# Altium PCB TL-WR703N.PcbDoc (part 1 of 3)
Units mm, origin at the board's own origin, x right, y up, seen from the top; angles counter-clockwise.
Board outline 48.52 x 50.08 mm, 2 copper layers (Top, Bottom); 241 components, 226 nets, 742 pads, 501 vias.
Unrouted connection lines stored in the file: 88.
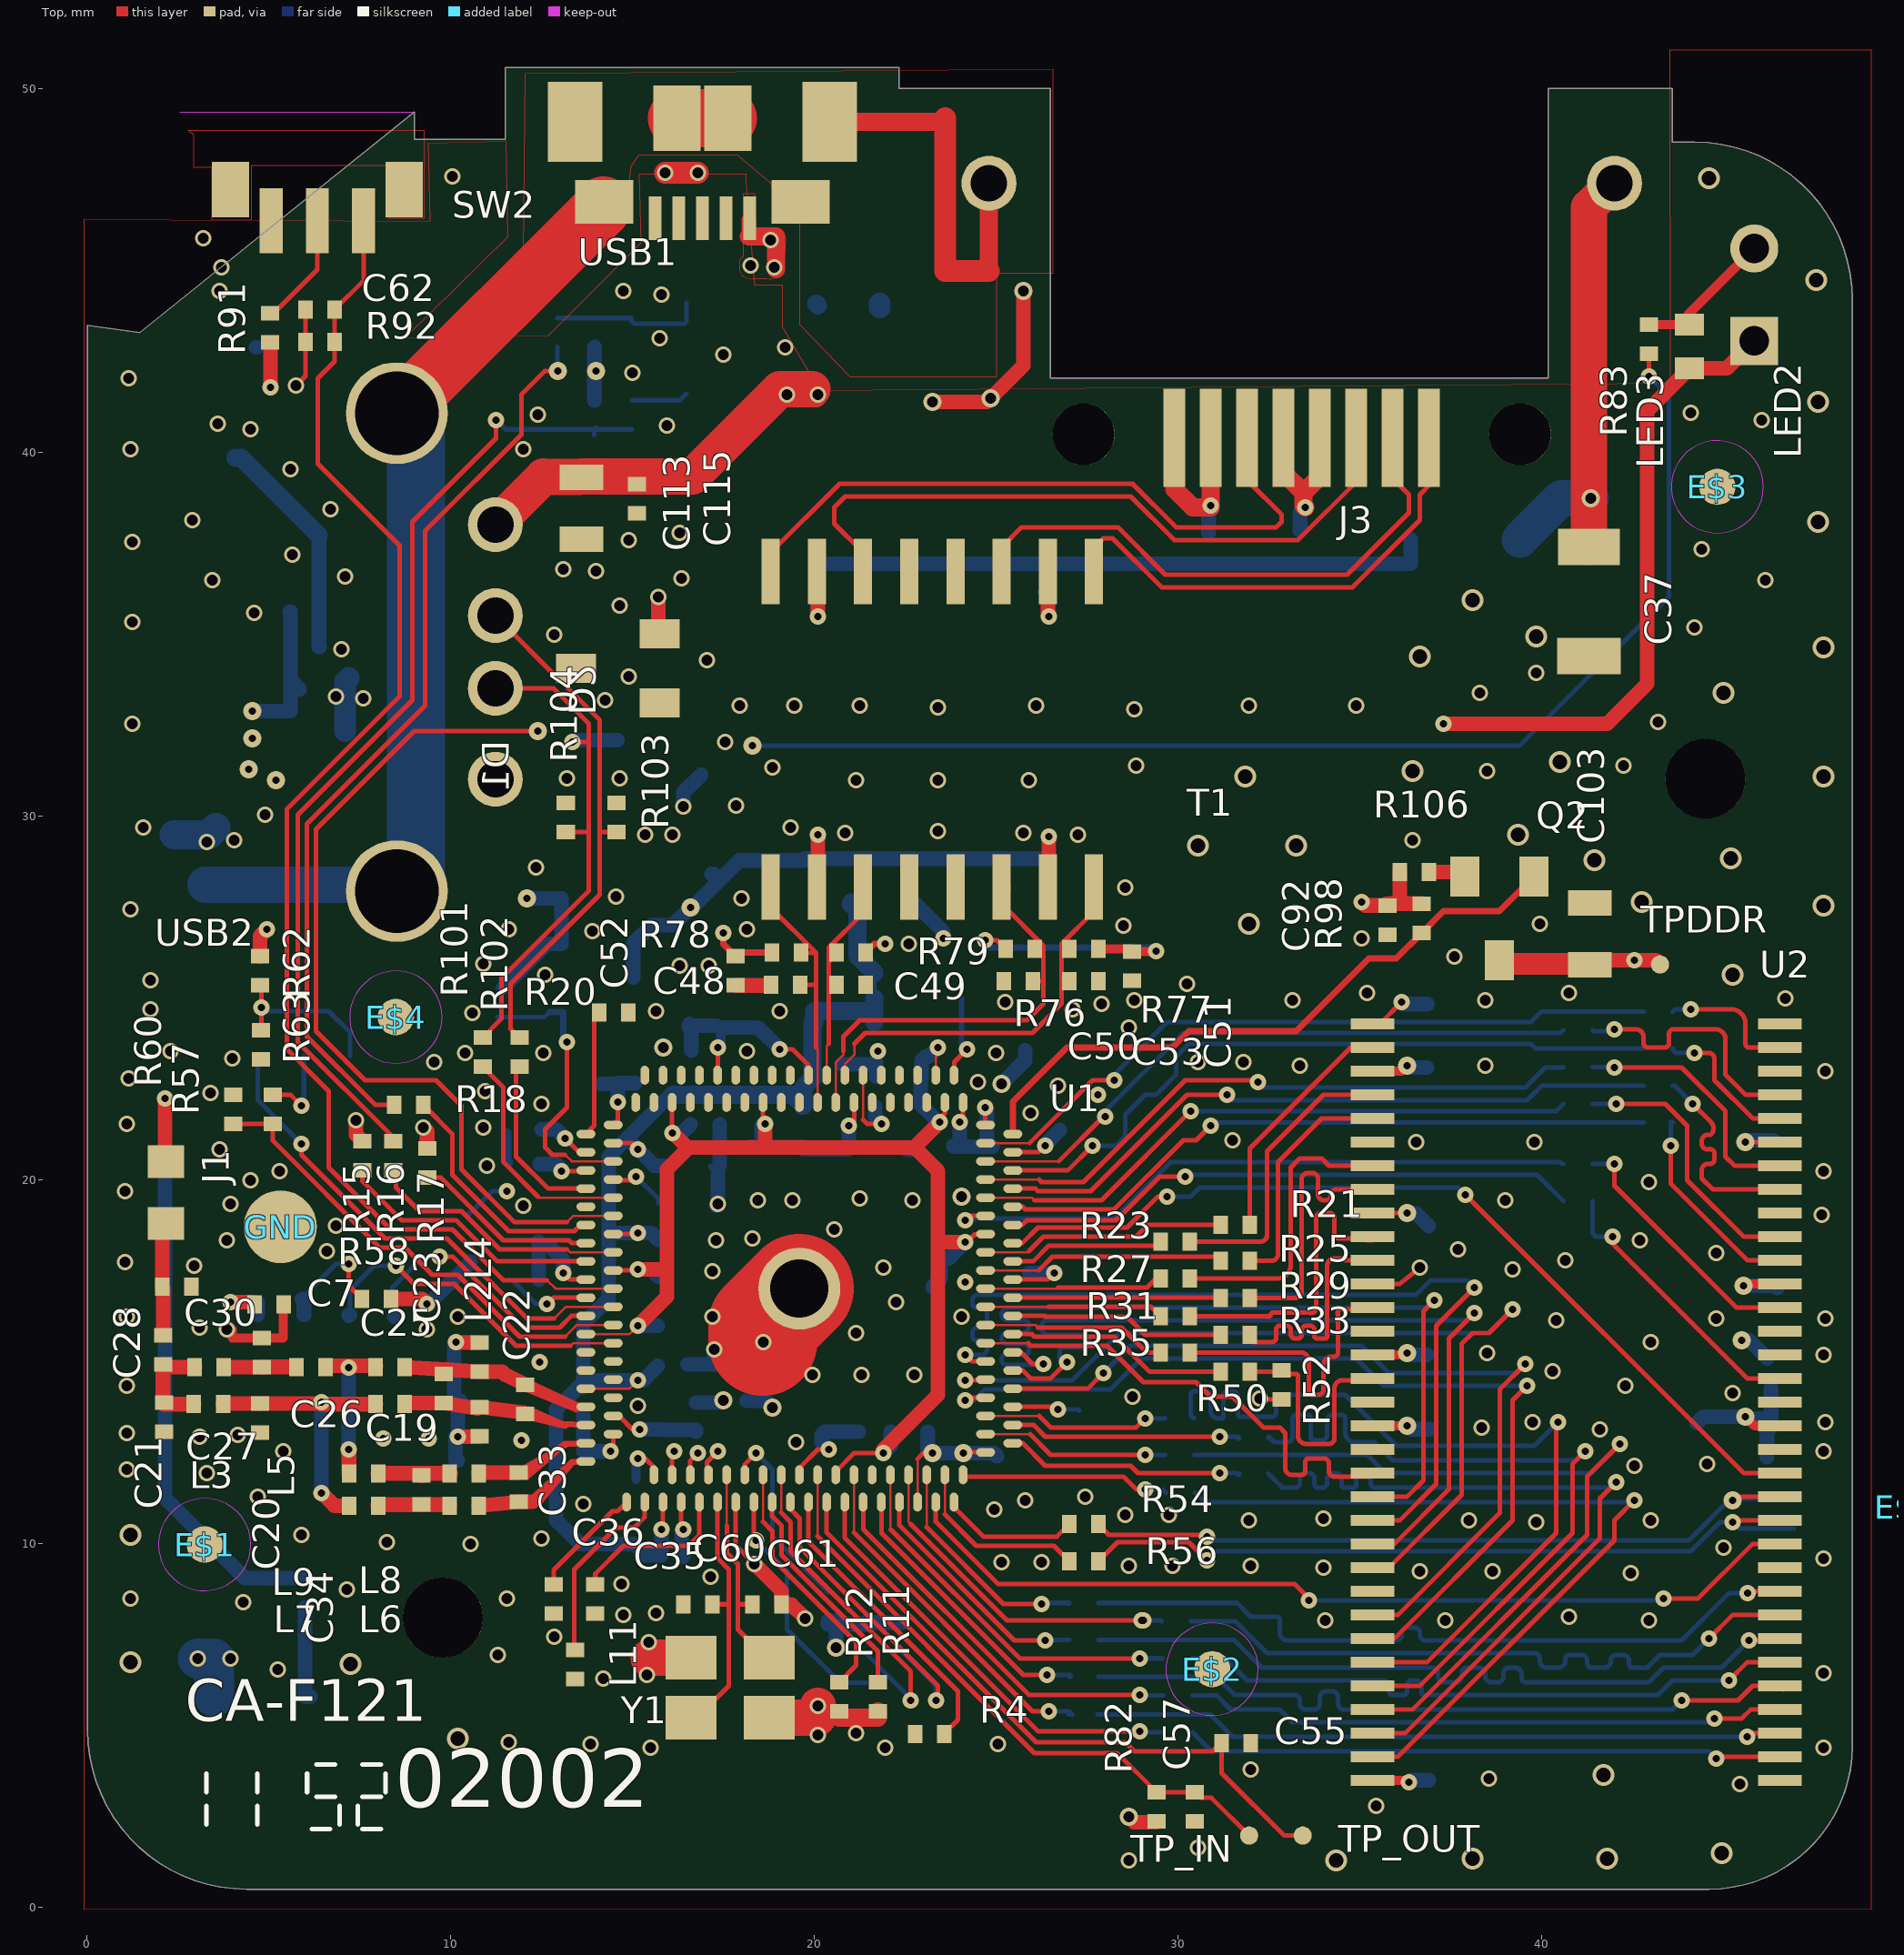
[diagram p0: Top view]
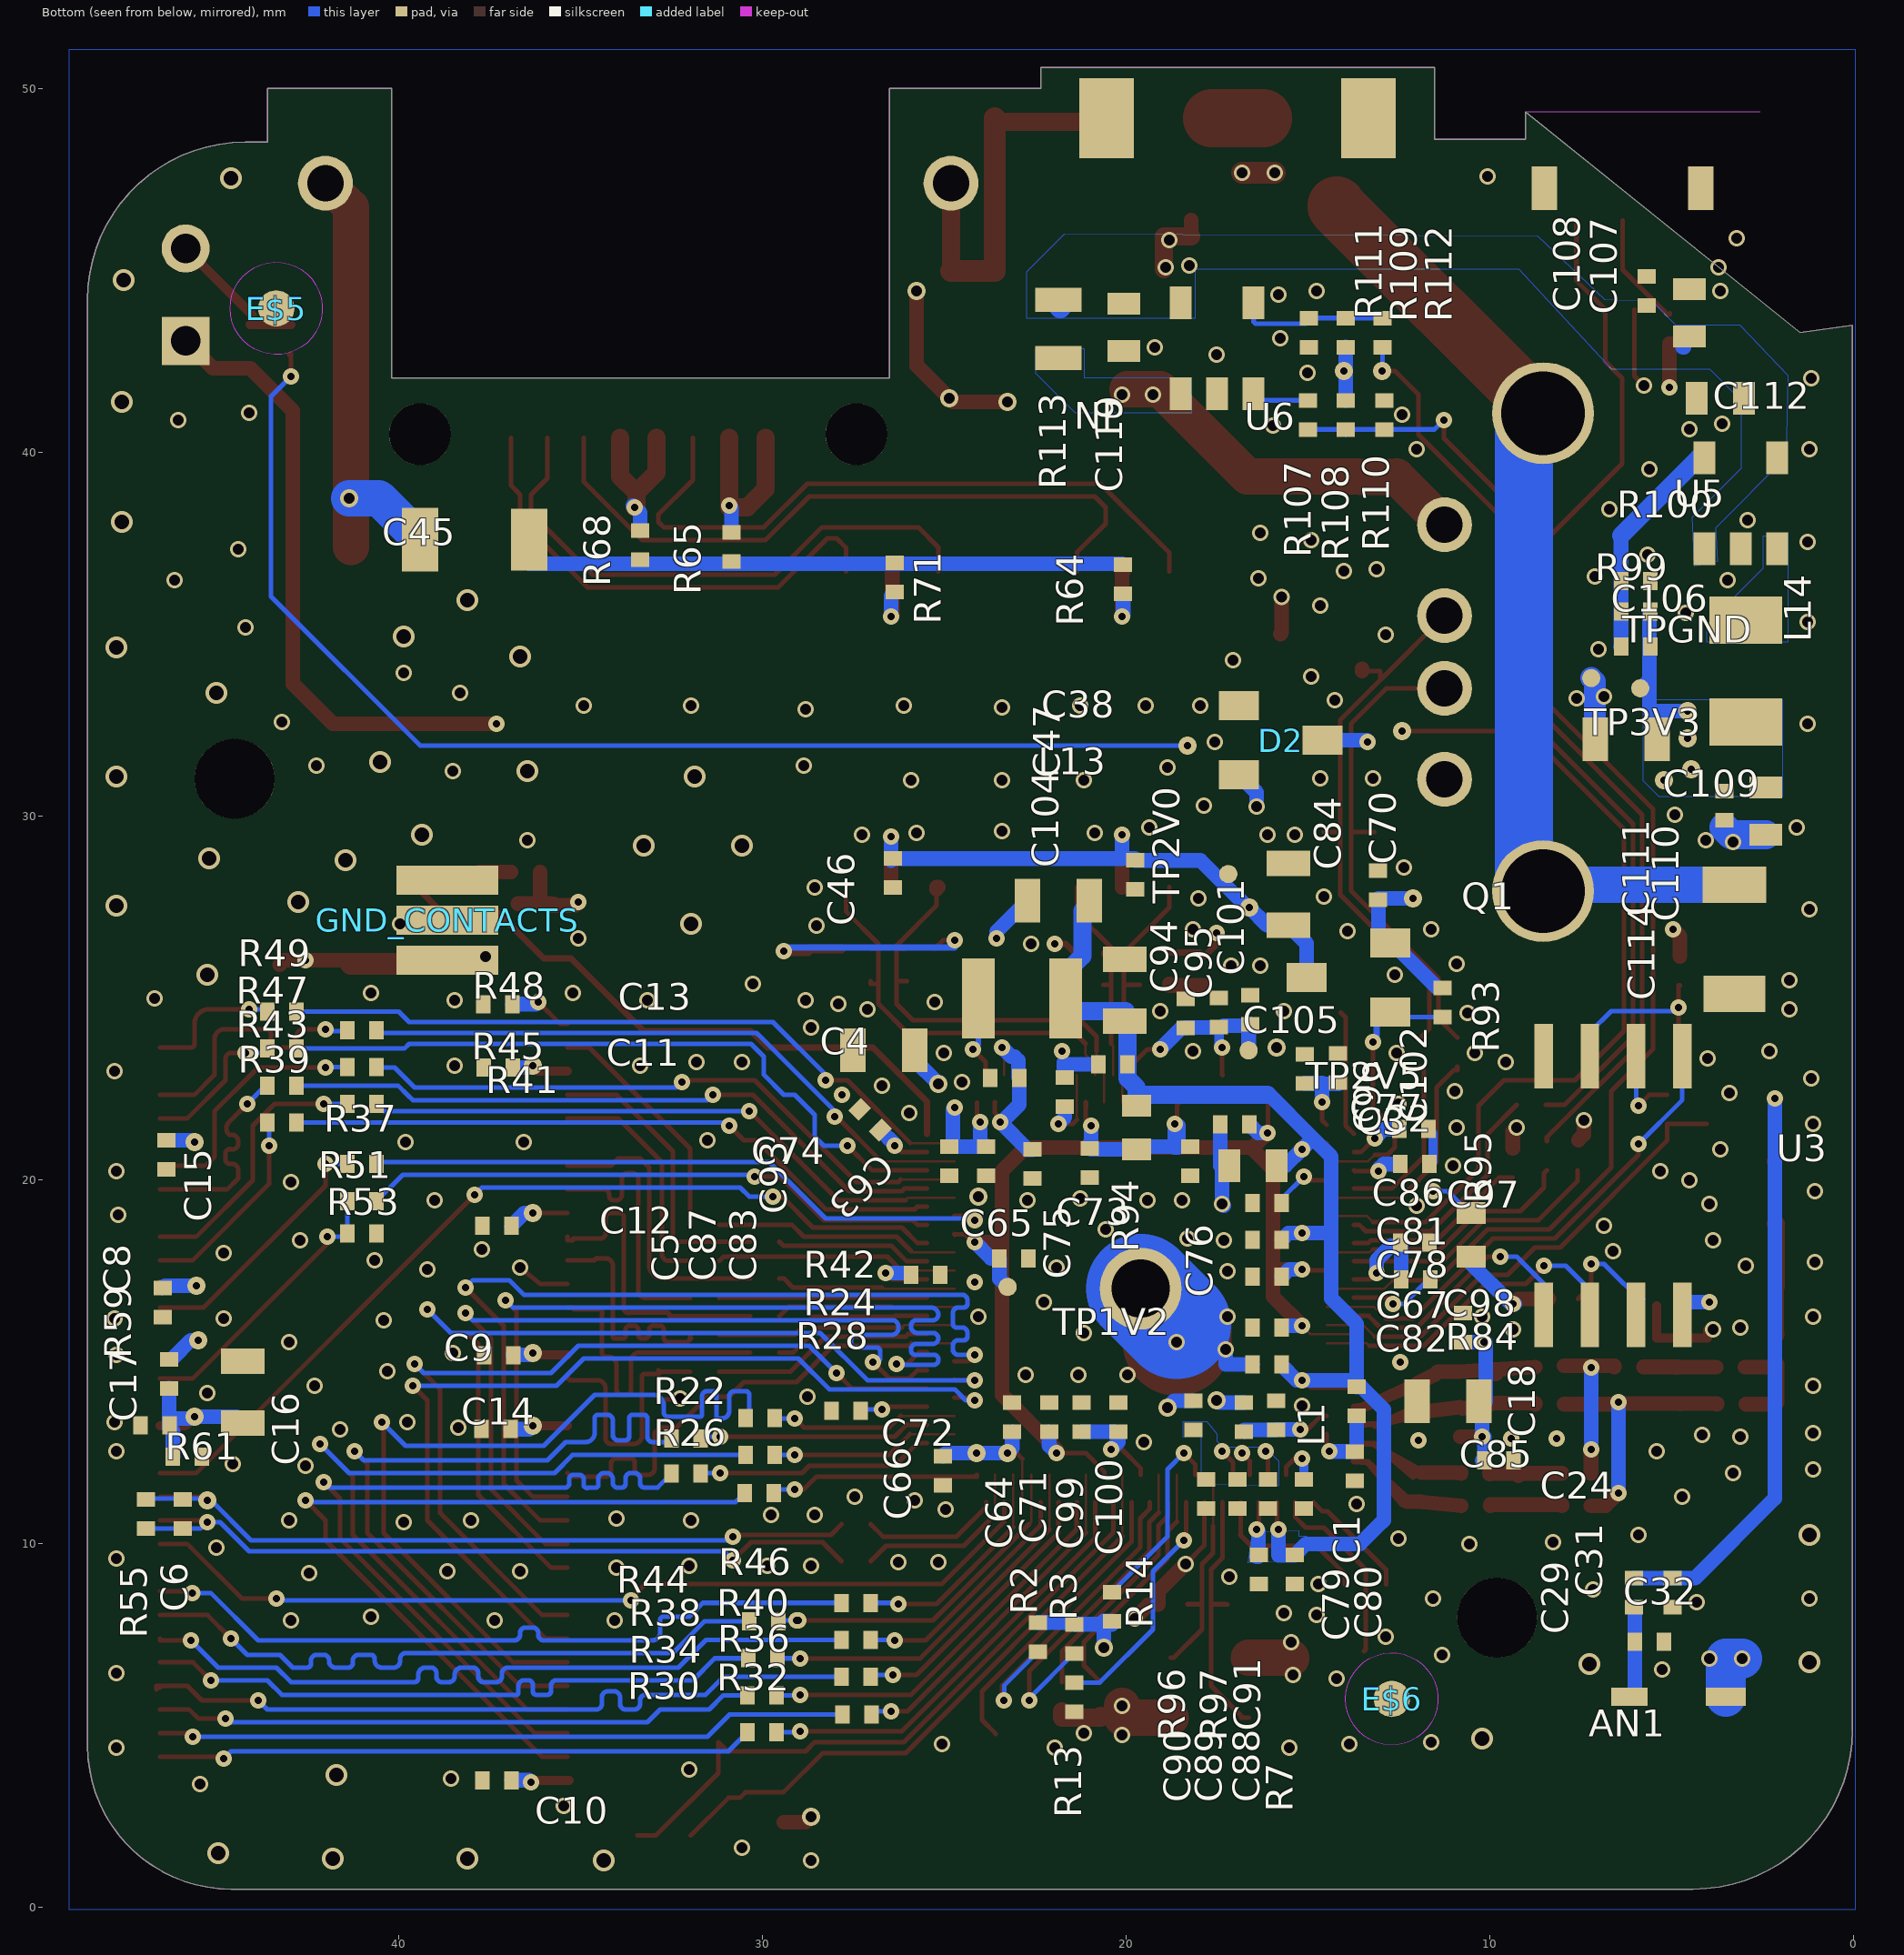
[diagram p1: Bottom view, seen from below]

## Layer stack, top to bottom
Top Solder: solder mask 0.0102, Solder Resist, Dk 3.5
Top: signal copper 0.035
Dielectric 1: dielectric 0.32, FR-4, Dk 4.8
Bottom: signal copper 0.035
Bottom Solder: solder mask 0.0102, Solder Resist, Dk 3.5

## Board outline
1.47,43.29 0.03,43.49 0.03,4.86 ccw(c4.4,4.86) 4.4,0.49 44.61,0.49 ccw(c44.61,4.43) 48.55,4.43 48.55,44.19 ccw(c44.22,44.19) 44.22,48.52 43.6,48.52 43.6,50 40.19,50 40.19,42.04 26.5,42.04 26.5,50 22.34,50 22.34,50.57 11.52,50.57 11.52,48.6 9.01,48.6 9.01,49.35

## Design rules (kind name [scope] priority, off if disabled: settings)
AssemblyTestPointUsage [All] p0: scope1count=1 scope1_0_kind=Board scope1_0_value=Board scope2count=1 scope2_0_kind=Board scope2_0_value=Board commentlength=0
AssemblyTestpoint [All] p0: scope1count=1 scope1_0_kind=Board scope1_0_value=Board scope2count=1 scope2_0_kind=Board scope2_0_value=Board commentlength=0
BoardOutlineClearance mdCopperDimension [All] p0: scope1count=1 scope1_0_kind=Board scope1_0_value=Board scope2count=1 scope2_0_kind=Board scope2_0_value=Board commentlength=0 gap=0.254
BoardOutlineClearance mdCopperDimension [All] p1: gap=0.254 ignorepadtopadclearanceinfootprint=FALSE except(0: Arc-SplitContinuation Track-SplitContinuation SMDPad-SplitContinuation THPad-SplitContinuation Via-SplitContinuation Fill-SplitContinuation Poly-SplitContinuation Region-SplitContinuation Text-SplitContinuation; 0.508: Poly-OutlineEdge Poly-CavityEdge Poly-CutoutEdge Poly-SplitBarrior)
Clearance "Clearance (Same Net)" [All] p0: scope1count=1 scope1_0_kind=Board scope1_0_value=Board scope2count=1 scope2_0_kind=Board scope2_0_value=Board commentlength=0 gap=0.152
Clearance Clearance_for_NetClass_Power [All] p0: scope1count=1 scope1_0_kind=NetClass scope1_0_value=Power scope2count=1 scope2_0_kind=NetClass scope2_0_value=Power commentlength=0 gap=0.305
Clearance Clearance_for_NetClass_RF [All] p0: scope1count=1 scope1_0_kind=NetClass scope1_0_value=RF scope2count=1 scope2_0_kind=NetClass scope2_0_value=RF commentlength=0 gap=0.508
Clearance [All] p0: scope1count=1 scope1_0_kind=Board scope1_0_value=Board scope2count=1 scope2_0_kind=Board scope2_0_value=Board commentlength=0 gap=0.152
Clearance "Clearance (Same Net)" [All] p1: gap=0.152 ignorepadtopadclearanceinfootprint=FALSE except(0.203: SMDPad-SMDPad SMDPad-THPad SMDPad-Via)
Clearance Clearance_for_NetClass_Power [InNetClass('Power') vs InNetClass('Power')] p2: gap=0.305 ignorepadtopadclearanceinfootprint=FALSE
Clearance Clearance_for_NetClass_RF [InNetClass('RF') vs InNetClass('RF')] p3: gap=0.508 ignorepadtopadclearanceinfootprint=FALSE
Clearance [All] p4: gap=0.152 ignorepadtopadclearanceinfootprint=FALSE except(0.203: Track-THPad Track-Via THPad-THPad THPad-Via Via-Via)
ComponentClearance [All] p0: scope1count=1 scope1_0_kind=Board scope1_0_value=Board scope2count=1 scope2_0_kind=Board scope2_0_value=Board commentlength=0 gap=0.254 collisioncheckmode=3
DiffPairsRouting [All] p0: scope1count=1 scope1_0_kind=Board scope1_0_value=Board scope2count=1 scope2_0_kind=Board scope2_0_value=Board commentlength=0
FabricationTestPointUsage [All] p0: scope1count=1 scope1_0_kind=Board scope1_0_value=Board scope2count=1 scope2_0_kind=Board scope2_0_value=Board commentlength=0 valid=0 allowmultiple=FALSE
FabricationTestpoint [All] p0: scope1count=1 scope1_0_kind=Board scope1_0_value=Board scope2count=1 scope2_0_kind=Board scope2_0_value=Board commentlength=0 side=3 testpointundercomponent=TRUE minsize=1.016 maxsize=2.54 preferedsize=1.524 minholesize=0 maxholesize=1.016 preferedholesize=0.813 testpointgrid=0.025
FanoutControl Fanout_BGA [All] p0 off: scope1count=1 scope1_0_kind=Board scope1_0_value=Board scope2count=1 scope2_0_kind=Board scope2_0_value=Board commentlength=69 // Protel DXP Scope 1 Expression Was: IsBGA   Fanout_BGA (Default Rule)
FanoutControl Fanout_LCC [All] p0 off: scope1count=1 scope1_0_kind=Board scope1_0_value=Board scope2count=1 scope2_0_kind=Board scope2_0_value=Board commentlength=69 // Protel DXP Scope 1 Expression Was: IsLCC   Fanout_LCC (Default Rule)
FanoutControl Fanout_SOIC [All] p0 off: scope1count=1 scope1_0_kind=Board scope1_0_value=Board scope2count=1 scope2_0_kind=Board scope2_0_value=Board commentlength=71 // Protel DXP Scope 1 Expression Was: IsSOIC   Fanout_SOIC (Default Rule)
FanoutControl Fanout_Small [All] p0 off: scope1count=1 scope1_0_kind=Board scope1_0_value=Board scope2count=1 scope2_0_kind=Board scope2_0_value=Board commentlength=84 // Protel DXP Scope 1 Expression Was: (CompPinCount < 5)   Fanout_Small (Default Rule)
FanoutControl Fanout_Default [All] p0: scope1count=1 scope1_0_kind=Board scope1_0_value=Board scope2count=1 scope2_0_kind=Board scope2_0_value=Board commentlength=30 // Fanout_Default (Default Rule)
Height [All] p0: scope1count=1 scope1_0_kind=Board scope1_0_value=Board scope2count=1 scope2_0_kind=Board scope2_0_value=Board commentlength=0
HoleSize HoleSize_For_NetClass_Power [All] p0: scope1count=1 scope1_0_kind=NetClass scope1_0_value=Power scope2count=1 scope2_0_kind=Board scope2_0_value=Board commentlength=0 absolutevalues=TRUE maxlimit=0 minlimit=0 maxpercent=80.000 minpercent=20.000
HoleSize HoleSize_For_NetClass_RF [All] p0: scope1count=1 scope1_0_kind=NetClass scope1_0_value=RF scope2count=1 scope2_0_kind=Board scope2_0_value=Board commentlength=0 absolutevalues=TRUE maxlimit=0 minlimit=0 maxpercent=80.000 minpercent=20.000
HoleSize [All] p0: scope1count=1 scope1_0_kind=Board scope1_0_value=Board scope2count=1 scope2_0_kind=Board scope2_0_value=Board commentlength=0 absolutevalues=TRUE maxlimit=2540 minlimit=0.051 maxpercent=80.000 minpercent=20.000
HoleSize HoleSize_For_NetClass_Power [InNetClass('Power')] p1: absolutevalues=TRUE maxlimit=0 minlimit=0 maxpercent=80.000 minpercent=20.000
HoleSize HoleSize_For_NetClass_RF [InNetClass('RF')] p2: absolutevalues=TRUE maxlimit=0 minlimit=0 maxpercent=80.000 minpercent=20.000
HoleSize [All] p3: absolutevalues=TRUE maxlimit=2540 minlimit=0.051 maxpercent=80.000 minpercent=20.000
HoleToHoleClearance mdDrill [All] p0: scope1count=1 scope1_0_kind=Board scope1_0_value=Board scope2count=1 scope2_0_kind=Board scope2_0_value=Board commentlength=0
HoleToHoleClearance mdDrill [All] p1: gap=0.152 allowstackedmicrovias=TRUE
LayerPairs [All] p0: scope1count=1 scope1_0_kind=Board scope1_0_value=Board scope2count=1 scope2_0_kind=Board scope2_0_value=Board commentlength=0 enforce=TRUE
MinimumSolderMaskSliver [All] p0 off: scope1count=1 scope1_0_kind=Board scope1_0_value=Board scope2count=1 scope2_0_kind=Board scope2_0_value=Board commentlength=0
MinimumSolderMaskSliver [All] p1 off: minsoldermaskwidth=0.254
NetAntennae [All] p0: scope1count=1 scope1_0_kind=Board scope1_0_value=Board scope2count=1 scope2_0_kind=Board scope2_0_value=Board commentlength=0
PasteMaskExpansion Expansion_SMDPaste_OFF [All] p0: scope1count=1 scope1_0_kind=PadClass scope1_0_value=SMDPaste_OFF scope2count=1 scope2_0_kind=Board scope2_0_value=Board commentlength=0 expansion=0
PasteMaskExpansion mlMinCreamFrame [All] p0: scope1count=1 scope1_0_kind=Board scope1_0_value=Board scope2count=1 scope2_0_kind=Board scope2_0_value=Board commentlength=0 expansion=0
PasteMaskExpansion Expansion_SMDPaste_OFF [InPadClass('SMDPaste_OFF')] p1: expansion=0
PasteMaskExpansion mlMinCreamFrame [All] p2: expansion=0
PlaneClearance [All] p0: scope1count=1 scope1_0_kind=Board scope1_0_value=Board scope2count=1 scope2_0_kind=Board scope2_0_value=Board commentlength=0 clearance=0.508
PlaneConnect [All] p0: scope1count=1 scope1_0_kind=Board scope1_0_value=Board scope2count=1 scope2_0_kind=Board scope2_0_value=Board commentlength=0 planeconnectstyle=Relief reliefexpansion=0.508 reliefentries=4 reliefconductorwidth=0.254 reliefairgap=0.254
PolygonConnect PolygonConnect_For_PolygonThermal_ON_Width50000_Gap100000 [All] p0 off: scope1count=1 scope1_0_kind=Board scope1_0_value=Board scope2count=1 scope2_0_kind=Board scope2_0_value=Board commentlength=48 connectstyle=Relief reliefconductorwidth=0.127 reliefentries=4 polygonreliefangle="90 Angle" // Protel DXP Scope 2 Expression Was: Not IsVia
PolygonConnect PolygonConnect_For_PolygonThermal_OFF [All] p0 off: scope1count=1 scope1_0_kind=Board scope1_0_value=Board scope2count=1 scope2_0_kind=Board scope2_0_value=Board commentlength=75 connectstyle=Direct reliefconductorwidth=0.254 reliefentries=4 polygonreliefangle="90 Angle" // Protel DXP Scope 1 Expression Was: InPolygonClass('PolygonThermal_OFF')
PolygonConnect ThermalVias [All] p0 off: scope1count=1 scope1_0_kind=Board scope1_0_value=Board scope2count=1 scope2_0_kind=Board scope2_0_value=Board commentlength=44 connectstyle=Direct reliefconductorwidth=0.254 reliefentries=4 polygonreliefangle="90 Angle" // Protel DXP Scope 1 Expression Was: IsVia
PolygonConnect [All] p0: scope1count=1 scope1_0_kind=Board scope1_0_value=Board scope2count=1 scope2_0_kind=Board scope2_0_value=Board commentlength=0 connectstyle=Relief reliefconductorwidth=0.254 reliefentries=4 polygonreliefangle="90 Angle"
PolygonConnect PolygonConnect_For_PolygonThermal_ON_Width50000_Gap100000 [InPolygonClass('PolygonThermal_ON_Width50000_Gap100000') vs Not IsVia] p1: connectstyle=Relief reliefconductorwidth=0.127 reliefentries=4 polygonreliefangle="90 Angle" airgapwidth=0.254
PolygonConnect PolygonConnect_For_PolygonThermal_OFF [InPolygonClass('PolygonThermal_OFF')] p2: connectstyle=Direct reliefconductorwidth=0.254 reliefentries=4 polygonreliefangle="90 Angle" airgapwidth=0.254
PolygonConnect ThermalVias [IsVia] p3: connectstyle=Direct reliefconductorwidth=0.254 reliefentries=4 polygonreliefangle="90 Angle" airgapwidth=0.254
PolygonConnect [All] p4: connectstyle=Relief reliefconductorwidth=0.254 reliefentries=4 polygonreliefangle="90 Angle" airgapwidth=0.254
RoutingCorners [All] p0: scope1count=1 scope1_0_kind=Board scope1_0_value=Board scope2count=1 scope2_0_kind=Board scope2_0_value=Board commentlength=0 cornerstyle=45-Degree minsetback=2.54 maxsetback=2.54
RoutingLayers [All] p0: scope1count=1 scope1_0_kind=Board scope1_0_value=Board scope2count=1 scope2_0_kind=Board scope2_0_value=Board commentlength=0 top layer=Automatic bottom layer=Automatic
RoutingPriority [All] p0: scope1count=1 scope1_0_kind=Board scope1_0_value=Board scope2count=1 scope2_0_kind=Board scope2_0_value=Board commentlength=0
RoutingTopology [All] p0: scope1count=1 scope1_0_kind=Board scope1_0_value=Board scope2count=1 scope2_0_kind=Board scope2_0_value=Board commentlength=0 topology=Shortest
RoutingVias [All] p0: scope1count=1 scope1_0_kind=Board scope1_0_value=Board scope2count=1 scope2_0_kind=Board scope2_0_value=Board commentlength=0 holewidth=0.051 width=0.152 viastyle="Through Hole" minholewidth=0.051 minwidth=0.152 maxholewidth=2.54 maxwidth=2.54
RoutingVias [All] p1: holewidth=0.051 width=0.152 viastyle="Through Hole" minholewidth=0.051 minwidth=0.152 maxholewidth=2.54 maxwidth=2.54
ShortCircuit [All] p0: scope1count=1 scope1_0_kind=Board scope1_0_value=Board scope2count=1 scope2_0_kind=Board scope2_0_value=Board commentlength=0 allowed=FALSE
SilkToBoardRegionClearance [All] p0: scope1count=1 scope1_0_kind=Board scope1_0_value=Board scope2count=1 scope2_0_kind=Board scope2_0_value=Board commentlength=0
SilkToSilkClearance [All] p0: scope1count=1 scope1_0_kind=Board scope1_0_value=Board scope2count=1 scope2_0_kind=Board scope2_0_value=Board commentlength=0
SilkToSolderMaskClearance [All] p0 off: scope1count=1 scope1_0_kind=Board scope1_0_value=Board scope2count=1 scope2_0_kind=Board scope2_0_value=Board commentlength=44 // Protel DXP Scope 1 Expression Was: IsPad
SolderMaskExpansion Expansion_SMDSolder_OFF [All] p0: scope1count=1 scope1_0_kind=PadClass scope1_0_value=SMDSolder_OFF scope2count=1 scope2_0_kind=Board scope2_0_value=Board commentlength=0 expansion=0
SolderMaskExpansion mlMinStopFrame [All] p0: scope1count=1 scope1_0_kind=Board scope1_0_value=Board scope2count=1 scope2_0_kind=Board scope2_0_value=Board commentlength=0 expansion=0.102
SolderMaskExpansion Expansion_SMDSolder_OFF [InPadClass('SMDSolder_OFF')] p1: expansion=0 istentingtop=FALSE
SolderMaskExpansion mlMinStopFrame [All] p2: expansion=0.102 istentingtop=FALSE
UnRoutedNet [All] p0: scope1count=1 scope1_0_kind=Board scope1_0_value=Board scope2count=1 scope2_0_kind=Board scope2_0_value=Board commentlength=0
UnpouredPolygon [All] p0: scope1count=1 scope1_0_kind=Board scope1_0_value=Board scope2count=1 scope2_0_kind=Board scope2_0_value=Board commentlength=0
Width Width_For_NetClass_Power [All] p0: scope1count=1 scope1_0_kind=NetClass scope1_0_value=Power scope2count=1 scope2_0_kind=Board scope2_0_value=Board commentlength=0 maxlimit=0.254 minlimit=2539.975 preferedwidth=0.127
Width Width_For_NetClass_RF [All] p0: scope1count=1 scope1_0_kind=NetClass scope1_0_value=RF scope2count=1 scope2_0_kind=Board scope2_0_value=Board commentlength=0 maxlimit=0.254 minlimit=2539.975 preferedwidth=0.127
Width [All] p0: scope1count=1 scope1_0_kind=Board scope1_0_value=Board scope2count=1 scope2_0_kind=Board scope2_0_value=Board commentlength=0 maxlimit=0.254 minlimit=0.203 preferedwidth=0.203
Width Width_For_NetClass_Power [InNetClass('Power')] p1: maxlimit=0.254 minlimit=2539.975 preferedwidth=0.127 toplayer_minwidth=0 bottomlayer_minwidth=0 minimp=50.000000 maximp=50.000000 favimp=50.000000
Width Width_For_NetClass_RF [InNetClass('RF')] p2: maxlimit=0.254 minlimit=2539.975 preferedwidth=0.127 toplayer_minwidth=0 bottomlayer_minwidth=0 minimp=50.000000 maximp=50.000000 favimp=50.000000
Width [All] p3: maxlimit=0.254 minlimit=0.203 preferedwidth=0.203
26 further rules are at their usual default settings.

## Classes and differential pairs
pad class SMDSolder_OFF: AN1-GND AN1-RF E$1-1 E$2-1 E$3-1 E$4-1 E$5-1 E$6-1 U1-A3 U1-A4 U1-A5 U1-A6 U1-A7 U1-A8 U1-A9 U1-A10 U1-A11 U1-A12 U1-A13 U1-A14 U1-A15 U1-A16 U1-A17 U1-A18 U1-A19 U1-A20 U1-A25 U1-A26 U1-A27 U1-A28 U1-A29 U1-A30 U1-A31 U1-A32 U1-A33 U1-A34 U1-A35 U1-A36 U1-A37 U1-A38 U1-A39 U1-A40 U1-A41 U1-A42 U1-A47 U1-A48 U1-A49 U1-A50 U1-A51 U1-A52 U1-A53 U1-A54 U1-A55 U1-A56 U1-A57 U1-A58 U1-A59 U1-A60 U1-A61 U1-A62 U1-A63 U1-A64 U1-A65 U1-A68 U1-A69 U1-A70 U1-A71 U1-A72 U1-A73 U1-A74 U1-A75 U1-A76 U1-A77 U1-A78 U1-A79 U1-A80 U1-A81 U1-A82 U1-A83 U1-A84 U1-A85 U1-A86 U1-B1 U1-B2 U1-B3 U1-B4 U1-B5 U1-B6 U1-B7 U1-B8 U1-B9 U1-B10 U1-B11 U1-B12 U1-B13 U1-B14 U1-B15 U1-B16 U1-B17 U1-B18 U1-B19 U1-B20 U1-B21 U1-B22 U1-B23 U1-B24 U1-B25 U1-B26 U1-B27 U1-B28 U1-B29 U1-B30 U1-B31 U1-B32 U1-B33 U1-B34 U1-B35 U1-B36 U1-B37 U1-B38 U1-B39 U1-B40 U1-B41 U1-B42 U1-B43 U1-B44 U1-B45 U1-B46 U1-B47 U1-B48 U1-B49 U1-B50 U1-B51 U1-B52 U1-B53 U1-B54 U1-B55 U1-B56 U1-B59 U1-B60 U1-B61 U1-B62 U1-B63 U1-B64 U1-B65 U1-B66 U1-B67 U1-B68 U1-B69 U1-B70 U1-B71 U1-B72 U1-B73 U1-B74 U1-B75 U1-B76
pad class SMDPaste_OFF: AN1-GND AN1-RF E$1-1 E$2-1 E$3-1 E$4-1 E$5-1 E$6-1 GND-1
net class Power: +1V2 +2V0 +2V5 +5V0 GPIO13 S$48 S$69 S$70 S$124 S$129 S$133 S$146 S$155 S$158 S$163 S$168 S$169 S$176 S$186 S$187 S$192 S$203 S$354 S$380 S$430 S$434 USB_POWER VBUS VDD VDDQ
net class RF: ANT1 ANT1_INN ANT1_INP ANT1_INT ANT1_OUTN ANT1_OUTP ETH_GND S$17 S$73 S$80 S$87 S$94 S$110 S$111 S$127 S$130 S$173 S$175 S$177 S$179 S$181 S$183 SHIELD

## Components (designator, comment, footprint, x,y, rotation, side; value= is the part's Value field where it differs from the comment)
AN1 "WIFI_ANTENNA" WIFI_ANTENNA 5.961,5.782 r180 bottom
C1 "1n" C0402 13.708,12.12 r270 bottom
C2 "10n" C0402 12.084,21.391 r180 bottom
C3 "1u 0603" C0603 16.511,20.382 r270 bottom
C4 "10u 0805" C0805 26.658,23.55 r180 bottom
C5 "100n" C0402 24.857,20.502 r270 bottom
C6 "NP" C0402 45.931,10.8 r90 bottom
C7 "100n" C0402 5.026,16.569 r0 top
C8 "10n" C0402 46.489,16.615 r270 bottom
C9 "10n" C0402 37.249,15.168 r180 bottom
C10 "10n" C0402 37.299,3.484 r180 bottom
C11 "10n" C0402 37.261,23.082 r180 bottom
C12 "10n" C0402 37.299,18.724 r180 bottom
C13 "10n" C0402 37.272,24.82 r180 bottom
C14 "10n" C0402 37.322,13.136 r180 bottom
C15 "10n" C0402 46.389,20.679 r270 bottom
C16 "10u 0805" C0805 44.28,14.152 r270 bottom
C17 "1n" C0402 46.693,13.24 r180 bottom
C18 "12p" C0402 10.737,15.93 r90 bottom
C19 "12p" C0402 8.351,13.825 r0 top
C20 "1p2" C0402 4.772,13.444 r90 top
C21 "1p2" C0402 2.132,13.467 r90 top
C22 "2p4" C0402 12.057,13.952 r90 top
C23 "NP" C0402 9.825,14.256 r90 top
C24 "10p" C0402 9.748,12.274 r180 bottom
C25 "12p" C0402 8.351,14.841 r0 top
C26 "2p4" C0402 6.169,14.841 r0 top
C27 "1p6" C0402 3.375,14.841 r0 top
C28 "12p" C0402 2.105,15.322 r90 top
C29 "0n" C0402 6.038,8.641 r270 bottom
C30 "low ind" C0402 2.486,17.05 r0 top
C31 "0p5" C0402 4.972,8.641 r270 bottom
C32 "NP" C0402 5.607,7.294 r0 bottom
C33 "2p4" C0402 11.88,11.539 r90 top
C34 "2p4" C0402 9.213,11.462 r90 top
C35 "100n" C0402 13.989,8.464 r90 top
C36 "50R" C0402 12.846,8.464 r90 top
C37 "1n 1206" C1206 41.309,35.896 r90 top
C38 "10u 0805" C0805 21.859,27.664 r0 bottom
C45 "1n 1206" C1206 37.907,37.597 r180 bottom
C46 "100n" C0402 26.404,28.426 r270 bottom
C47 "10n" C0402 19.75,28.376 r270 bottom
C48 "12p" C0402 19.219,25.355 r0 top
C49 "12p" C0402 21.02,25.355 r0 top
C50 "12p" C0402 25.619,25.455 r0 top
C51 "100n" C0402 28.74,25.863 r90 top
C52 "100n" C0402 17.849,25.736 r90 top
C53 "12p" C0402 27.42,25.455 r0 top
C55 "NP" C0402 31.611,4.504 r0 top
C57 "NP" C0402 30.468,2.749 r90 top
C60 "12p" C0402 16.806,8.314 r0 top
C61 "12p" C0402 18.711,8.314 r0 top
C62 "100p" C0402 6.423,43.92 r0 top
C63 "10n" C0402 27.039,21.645 r225 bottom
C64 "10n" C0402 23.129,13.467 r270 bottom
C65 "10n" C0402 25.515,17.377 r180 bottom
C66 "10n" C0402 25.034,11.993 r90 bottom
C67 "10n" C0402 16.121,15.93 r180 bottom
C70 "10n" C0402 13.073,28.095 r270 bottom
C71 "10n" C0402 22.113,13.467 r270 bottom
C72 "10n" C0402 27.701,13.644 r180 bottom
C73 "10n" C0402 23.079,17.835 r180 bottom
C74 "10n" C0402 23.333,22.788 r180 bottom
C75 "10n" C0402 20.997,20.452 r270 bottom
C76 "10n" C0402 18.23,20.502 r270 bottom
C77 "10n" C0402 17.01,21.518 r180 bottom
C78 "10n" C0402 16.121,17.327 r180 bottom
C79 "10n" C0402 16.348,9.276 r270 bottom
C80 "10n" C0402 15.359,9.276 r270 bottom
C81 "10n" C0402 16.121,18.343 r180 bottom
C82 "10n" C0402 16.121,14.914 r180 bottom
C83 "10n" C0402 22.571,20.425 r270 bottom
C84 "10u 0805" C0805 15.536,27.841 r270 bottom
C85 "22u 0805" C0805 11.145,13.898 r180 bottom
C86 "10n" C0402 16.121,19.359 r180 bottom
C87 "10n" C0402 23.841,20.502 r270 bottom
C88 "10n" C0402 16.094,11.358 r270 bottom
C89 "10n" C0402 16.933,11.358 r270 bottom
C90 "10n" C0402 17.795,11.358 r270 bottom
C91 "10n" C0402 15.867,13.517 r270 bottom
C92 "10n" C0402 35.775,27.133 r90 top
C93 "10n" C0402 21.682,22.407 r270 bottom
C94 "10n" C0402 18.357,24.566 r270 bottom
C95 "100n" C0402 17.441,24.593 r270 bottom
C96 "100n" C0402 15.082,23.046 r270 bottom
C97 "10n" C0402 12.057,20.425 r180 bottom
C98 "10n" C0402 12.057,18.266 r180 bottom
C99 "10n" C0402 21.224,13.467 r270 bottom
C100 "100n" C0402 20.208,13.467 r270 bottom
C101 "10n" C0402 16.579,24.67 r270 bottom
C102 "10n" C0402 14.166,23.069 r270 bottom
C103 "10u 0805" C0805 41.336,26.752 r90 top
C104 "22u 0805" C0805 20.031,25.201 r90 bottom
C105 "100n" C0402 20.362,23.169 r0 bottom
C106 "22p" C0402 5.988,34.649 r180 bottom
C107 "4u7 0603" C0603 4.511,43.832 r180 bottom
C108 "100n" C0402 5.684,44.428 r270 bottom
C109 "10u 0805" C0805 6.242,32.109 r180 bottom
C110 "NP" C0603 2.411,30.132 r180 bottom
C111 "100n" C0402 3.552,30.281 r270 bottom
C112 "4u7 0603" C0603 3.661,41.482 r270 bottom
C113 "10u 0805" C0805 13.608,38.459 r90 top
C114 "1n 1206" C1206 3.271,26.598 r270 bottom
C115 "100n" C0402 15.128,38.713 r90 top
C119 "1u 0603" C0603 20.061,43.432 r180 bottom
D1 "MMBD7000" SOT23-3 14.653,34.049 r90 top
D2 "MMBD7000" SOT23-3 15.794,32.077 r270 bottom
E$1 "" FIDUCIAL 3.248,9.965 r0 top
E$2 "" FIDUCIAL 30.949,6.536 r0 top
E$3 "" FIDUCIAL 44.838,39.044 r0 top
E$4 "" FIDUCIAL 8.505,24.466 r0 top
E$5 "" FIDUCIAL 43.364,43.951 r180 bottom
E$6 "" FIDUCIAL 12.692,5.72 r180 bottom
E$7 "" CC-BY-SA 50,11 r0 top
GND "" SHIELD_PAD 5.33,18.701 r0 top
GND_CONTACTS "" GND_3CONTACT 38.661,27.132 r180 bottom
J1 "JUMPER" J0603 2.182,19.64 r90 top
J3 "RJ45_2SH" RJ45_LP_RA_SMT 33.412,40.391 r0 top
L1 "0R" L0402 13.658,13.898 r90 bottom
L2 "low ind" L0402 10.814,13.34 r90 top
L3 "low ind" L0402 3.352,13.825 r0 top
L4 "low ind" L0402 10.814,15.118 r90 top
L5 "low ind" L0402 4.822,15.245 r90 top
L6 "low ind" L0402 10.383,11.031 r180 top
L7 "low ind" L0402 7.616,11.031 r180 top
L8 "low ind" L0402 10.383,11.92 r180 top
L9 "low ind" L0402 7.616,11.92 r180 top
L11 "50R" L0402 13.431,6.663 r90 top
L13 "1u" L1008 22.861,24.982 r270 bottom
L14 "4u" FERRITE_SELF 2.961,33.982 r0 bottom
LED2 "NP" LED3MM 45.854,44.328 r90 top
LED3 "Blue LED" LED0603 44.076,42.904 r0 top
Q1 "S8550M" SOT23-3 13.835,25.555 r90 bottom
Q2 "S8550M" SOT23-3 38.846,27.233 r180 top
R2 "10k" R0402 22.417,7.421 r270 bottom
R3 "10k" R0402 21.428,7.371 r270 bottom
R4 "10k" R0402 23.179,4.758 r180 top
R7 "6k2" R0402 15.105,11.358 r270 bottom
R11 "10k" R0402 21.759,5.774 r90 top
R12 "10k" R0402 20.693,5.774 r90 top
R13 "10k" R0402 21.428,5.77 r270 bottom
R14 "10k" R0402 20.385,8.26 r270 bottom
R15 "10k" R0402 7.589,20.656 r270 top
R16 "0R" R0402 8.428,20.656 r270 top
R17 "10k" R0402 9.367,20.452 r270 top
R18 "0R" R0402 8.859,22.053 r0 top
R20 "2k4" R0402 14.497,24.593 r0 top
R21 "22R" R0402 31.584,18.751 r180 top
R22 "22R" R0402 32.092,12.882 r0 bottom
R23 "22R" R0402 29.933,18.293 r180 top
R24 "22R" R0402 30.06,12.424 r0 bottom
R25 "22R" R0402 31.584,17.762 r180 top
R26 "22R" R0402 32.092,11.916 r0 bottom
R27 "22R" R0402 29.933,17.277 r180 top
R28 "22R" R0402 30.087,11.385 r0 bottom
R29 "22R" R0402 31.584,16.746 r180 top
R30 "22R" R0402 30.01,4.804 r0 bottom
R31 "22R" R0402 29.933,16.238 r180 top
R32 "22R" R0402 27.397,5.289 r0 bottom
R33 "22R" R0402 31.584,15.73 r180 top
R34 "22R" R0402 30.01,5.82 r0 bottom
R35 "22R" R0402 29.933,15.245 r180 top
R36 "22R" R0402 27.42,6.328 r0 bottom
R37 "22R" R0402 41.005,20.425 r0 bottom
R38 "22R" R0402 29.983,6.836 r0 bottom
R39 "22R" R0402 43.214,21.568 r0 bottom
R40 "22R" R0402 27.42,7.344 r0 bottom
R41 "22R" R0402 41.005,22.076 r0 bottom
R42 "22R" R0402 30.06,13.44 r0 bottom
R43 "22R" R0402 43.214,22.584 r0 bottom
R44 "22R" R0402 29.96,7.852 r0 bottom
R45 "22R" R0402 41.005,23.092 r0 bottom
R46 "22R" R0402 27.42,8.36 r0 bottom
R47 "22R" R0402 43.214,23.6 r0 bottom
R48 "22R" R0402 41.005,24.108 r0 bottom
R49 "22R" R0402 43.214,24.616 r0 bottom
R50 "22R" R0402 31.584,14.714 r180 top
R51 "22R" R0402 41.005,19.409 r0 bottom
R52 "10k" R0402 32.854,14.356 r270 top
R53 "10k" R0402 41.005,18.52 r0 bottom
R54 "22R" R0402 27.42,10.523 r0 top
R55 "100R" R0402 46.947,10.8 r90 bottom
R56 "22R" R0402 27.42,9.507 r0 top
R57 "1k" R0402 5.126,21.926 r270 top
R58 "10k" R0402 7.97,16.719 r180 top
R59 "6k2" R0402 46.312,14.66 r270 bottom
R60 "3k" R0402 4.037,21.926 r270 top
R61 "6k2" R0402 45.804,12.374 r180 bottom
R62 "10k" R0402 4.772,25.736 r270 top
R63 "NP" R0402 4.795,23.704 r270 top
R64 "75R" R0402 20.081,36.504 r270 bottom
R65 "75R" R0402 30.849,37.393 r270 bottom
R68 "75R" R0402 33.362,37.443 r270 bottom
R71 "75R" R0402 26.354,36.554 r270 bottom
R76 "50R" R0402 25.669,26.344 r0 top
R77 "50R" R0402 27.42,26.344 r0 top
R78 "50R" R0402 19.246,26.244 r0 top
R79 "50R" R0402 21.02,26.244 r0 top
R82 "10k" R0402 29.425,2.749 r90 top
R83 "3k8" R0402 42.96,43.108 r90 top
R84 "10k" R0402 12.034,17.25 r180 bottom
R91 "1k" R0402 5.049,43.412 r90 top
R92 "3k" R0402 6.423,43.031 r0 top
R93 "NP" R0402 11.295,24.87 r90 bottom
R94 "0R 0603" R0603 19.711,21.432 r180 bottom
R95 "10R 0603" R0603 10.511,18.482 r180 bottom
R96 "0R" R0402 18.153,13.517 r90 bottom
R97 "0R" R0402 16.756,13.467 r90 bottom
R98 "NP" R0402 36.714,27.183 r90 top
R99 "299k" R0402 5.988,35.615 r180 bottom
R100 "66k4" R0402 5.988,36.454 r0 bottom
R101 "0R" R0402 10.891,23.5 r270 top
R102 "0R" R0402 11.907,23.5 r270 top
R103 "NP" R0402 14.574,29.95 r90 top
R104 "NP" R0402 13.177,29.95 r90 top
R106 "0R" R0402 36.51,28.453 r180 top
R107 "0R" R0402 15.001,41.022 r90 bottom
R108 "1k" R0402 13.962,41.022 r90 bottom
R109 "1k" R0402 13.962,43.285 r90 bottom
R110 "3k" R0402 12.896,41.022 r90 bottom
R111 "3k" R0402 14.978,43.285 r90 bottom
R112 "0R" R0402 12.946,43.285 r90 bottom
R113 "NP" R0805 21.861,43.382 r180 bottom
SW2 "TACT_SWITCH_SPST" TACT_SWITCH_SPST_RA_SMT 6.346,46.36 r0 top
T1 "ETH10_100_TRANSFO" H1601CG 23.256,32.39 r0 top
TP1V2 "TEST_PAD" TEST_PAD 23.256,17.046 r180 bottom
TP2V0 "TEST_PAD" TEST_PAD 17.187,28.399 r180 bottom
TP2V5 "TEST_PAD" TEST_PAD 16.629,23.55 r180 bottom
TP3V3 "TEST_PAD" TEST_PAD 5.861,33.506 r180 bottom
TP_IN "TEST_PAD" TEST_PAD 31.965,1.964 r0 top
TP_OUT "TEST_PAD" TEST_PAD 33.439,1.964 r0 top
TPDDR "TEST_PAD" TEST_PAD 43.264,25.913 r0 top
TPGND "TEST_PAD" TEST_PAD 7.208,33.787 r180 bottom
U1 "" DRMLF164 19.6,17 r180 top
U2 "A3S56F40FTP" TSOP66 40.955,13.875 r0 top
U3 "S25FL032P0XMFI01" SOP8 6.611,19.832 r0 bottom
U5 "UNKNOWN_BUCK" SOT23-5 3.094,38.586 r180 bottom
U6 "TPS2041BDBV" SOT23-5 17.491,42.854 r180 bottom
USB1 "USB-MICROB" USB-MICROB 16.933,49.077 r180 top
USB2 "USB-A_TH" USB-A_TH -1.749,34.502 r270 top
Y1 "25.00 MHz" CRYSTAL_32_25 17.695,6.028 r180 top

## Footprints (in the part's own frame and the unit in brackets; to place one, negate y for a bottom-side part, rotate by r counter-clockwise, add the part's x,y. Pads: shape width x height; smd on the part's side, far side on the other; paste and mask are expansions set on the pad)
C0402 [mm] "C0402"
  rect 0.4x0.5 smd: 1(-0.4,0) 2(0.4,0)
C0603 [mm] "C0603"
  rect 0.9x0.6 smd: 1(0,0.65) 2(0,-0.65)
C0805 [mm] "C0805"
  rect 0.7x1.2 smd: 1(-0.85,0) 2(0.85,0)
C1206 [mm] "C1206"
  rect 1x1.75 smd: 1(-1.5,0)
  rect 1x1.7 smd: 2(1.5,0)
CC-BY-SA [mm] "CC-BY-SA"
CRYSTAL_32_25 [mm] "CRYSTAL_32_25"
  rect 1.4x1.2 smd: 1(-1.075,-0.825) 2(1.075,-0.825) 3(1.075,0.825) 4(-1.075,0.825)
DRMLF164 [mm] "DRMLF164"
  rrect100% 0.52x0.24 smd mask+0: A3(-5.869,4.25) A4(-5.869,3.75) A5(-5.869,3.25) A6(-5.869,2.75) A7(-5.869,2.25) A8(-5.869,1.75) A9(-5.869,1.25) A10(-5.869,0.75) A11(-5.869,0.25) A12(-5.869,-0.25) A13(-5.869,-0.75) A14(-5.869,-1.25) A15(-5.869,-1.75) A16(-5.869,-2.25) A17(-5.869,-2.75) A18(-5.869,-3.25) A19(-5.869,-3.75) A20(-5.869,-4.25) A47(5.869,-4.25) A48(5.869,-3.75) A49(5.869,-3.25) A50(5.869,-2.75) A51(5.869,-2.25) A52(5.869,-1.75) A53(5.869,-1.25) A54(5.869,-0.75) A55(5.869,-0.25) A56(5.869,0.25) A57(5.869,0.75) A58(5.869,1.25) A59(5.869,1.75) A60(5.869,2.25) A61(5.869,2.75) A62(5.869,3.25) A63(5.869,3.75) A64(5.869,4.25) A65(5.869,4.75) B1(-5.119,4.5) B2(-5.119,4) B3(-5.119,3.5) B4(-5.119,3) B5(-5.119,2.5) B6(-5.119,2) B7(-5.119,1.5) B8(-5.119,1) B9(-5.119,0.5) B10(-5.119,0) B11(-5.119,-0.5) B12(-5.119,-1) B13(-5.119,-1.5) B14(-5.119,-2) B15(-5.119,-2.5) B16(-5.119,-3) B17(-5.119,-3.5) B18(-5.119,-4) B19(-5.119,-4.5) B39(5.119,-4.5) B40(5.119,-4) B41(5.119,-3.5) B42(5.119,-3) B43(5.119,-2.5) B44(5.119,-2) B45(5.119,-1.5) B46(5.119,-1) B47(5.119,-0.5) B48(5.119,0) B49(5.119,0.5) B50(5.119,1) B51(5.119,1.5) B52(5.119,2) B53(5.119,2.5) B54(5.119,3) B55(5.119,3.5) B56(5.119,4)
  rrect100% 0.24x0.52 smd mask+0: A25(-4.25,-5.869) A26(-3.75,-5.869) A27(-3.25,-5.869) A28(-2.75,-5.869) A29(-2.25,-5.869) A30(-1.75,-5.869) A31(-1.25,-5.869) A32(-0.75,-5.869) A33(-0.25,-5.869) A34(0.25,-5.869) A35(0.75,-5.869) A36(1.25,-5.869) A37(1.75,-5.869) A38(2.25,-5.869) A39(2.75,-5.869) A40(3.25,-5.869) A41(3.75,-5.869) A42(4.25,-5.869) A68(4.75,5.869) A69(4.25,5.869) A70(3.75,5.869) A71(3.25,5.869) A72(2.75,5.869) A73(2.25,5.869) A74(1.75,5.869) A75(1.25,5.869) A76(0.75,5.869) A77(0.25,5.869) A78(-0.25,5.869) A79(-0.75,5.869) A80(-1.25,5.869) A81(-1.75,5.869) A82(-2.25,5.869) A83(-2.75,5.869) A84(-3.25,5.869) A85(-3.75,5.869) A86(-4.25,5.869) B20(-4.5,-5.119) B21(-4,-5.119) B22(-3.5,-5.119) B23(-3,-5.119) B24(-2.5,-5.119) B25(-2,-5.119) B26(-1.5,-5.119) B27(-1,-5.119) B28(-0.5,-5.119) B29(0,-5.119) B30(0.5,-5.119) B31(1,-5.119) B32(1.5,-5.119) B33(2,-5.119) B34(2.5,-5.119) B35(3,-5.119) B36(3.5,-5.119) B37(4,-5.119) B38(4.5,-5.119) B59(4,5.119) B60(3.5,5.119) B61(3,5.119) B62(2.5,5.119) B63(2,5.119) B64(1.5,5.119) B65(1,5.119) B66(0.5,5.119) B67(0,5.119) B68(-0.5,5.119) B69(-1,5.119) B70(-1.5,5.119) B71(-2,5.119) B72(-2.5,5.119) B73(-3,5.119) B74(-3.5,5.119) B75(-4,5.119) B76(-4.5,5.119)
  round 2.25 hole 1.5: PAD(0,0)
FERRITE_SELF [mm] "FERRITE_SELF"
  rect 2x1.3 smd: 1(0,1.4) 2(0,-1.4)
FIDUCIAL [mm] "FIDUCIAL"
  rrect100% 1x1 smd paste+0 mask+0: 1(0,0)
  Top keep-out circle w0: c0,0 r1.27
GND_3CONTACT [mil] "GND_3CONTACT"
  rect 110.24x31.5 smd: GND$1(0,43.31) GND$2(0,0) GND$3(0,-43.31)
H1601CG [mm] "H1601CG"
  rect 0.5x1.8 smd: 1(-4.445,-4.349) 2(-3.175,-4.349) 3(-1.905,-4.349) 4(-0.635,-4.349) 5(0.635,-4.349) 6(1.905,-4.349) 7(3.175,-4.349) 8(4.445,-4.349) 9(4.445,4.325) 10(3.175,4.325) 11(1.905,4.325) 12(0.635,4.325) 13(-0.635,4.325) 14(-1.905,4.325) 15(-3.175,4.325) 16(-4.445,4.325)
J0603 [mm] "J0603"
  rect 0.9x1 smd: 1(-0.85,0) 2(0.85,0)
L0402 [mm] "L0402"
  rect 0.4x0.5 smd: 1(-0.4,0) 2(0.4,0)
L1008 [mm] "L1008"
  rect 2.2x0.9 smd: 1(0,1.2) 2(0,-1.2)
LED3MM [mil] "LED3MM"
  rect 52x52 / inner round 48.04 / far side rect 52x52 hole 32: A(-50,0)
  round 52 hole 32: K(50,0)
LED0603 [mil] "LED0603"
  rect 31.5x23.62 smd: A(0,-23.62) C(0,23.62)
R0402 [mm] "R0402"
  rect 0.4x0.5 smd: 1(-0.4,0) 2(0.4,0)
R0603 [mil] "R0603"
  rect 31.5x23.62 smd: 1(0,23.62) 2(0,-23.62)
R0805 [mil] "R0805"
  rect 50x26 smd: 1(0,31.5) 2(0,-31.5)
RJ45_LP_RA_SMT [mm] "RJ45_LP_RA_SMT"
  rect 0.6x2.7 smd: 1(-3.5,0) 2(-2.5,0) 3(-1.5,0) 4(-0.5,0) 5(0.5,0) 6(1.5,0) 7(2.5,0) 8(3.5,0)
  round 1.508 hole 1: S$1(-8.6,7) S$2(8.6,7)
SHIELD_PAD [mm] "SHIELD_PAD"
  rrect100% 2x2 smd paste+0: 1(0,0)
SOP8 [mil] "SOP8"
  rect 20x70 smd: 1(-75,-140) 2(-25,-140) 3(25,-140) 4(75,-140) 5(75,140) 6(25,140) 7(-25,140) 8(-75,140)
SOT23-3 [mil] "SOT23-3"
  rect 31.5x43.31 smd: 1(-37.4,-43.31) 2(37.4,-43.31) 3(0,47.24)
SOT23-5 [mm] "SOT23-5"
  rect 0.6x0.9 smd: 1(-1,-1.25) 2(0,-1.25) 3(1,-1.25) 4(1,1.25) 5(-1,1.25)
TACT_SWITCH_SPST_RA_SMT [mil] "TACT_SWITCH_SPST_RA_SMT"
  rect 25x70 smd: 1(-50,0) 2(0,0) 3(50,0)
  rect 27.56x47.24 smd far side: P$1(-84.65,35.43) P$2(84.65,35.43)
  rect 40x60 smd: S$1(-93.94,33.94) S$2(93.94,33.94)
TEST_PAD [mm] "TEST_PAD"
  rrect100% 0.5x0.5 smd: 1(0,0)
TSOP66 [mm] "TSOP66"
  rect 1.2x0.3 smd: 1(-5.6,10.4) 2(-5.6,9.75) 3(-5.6,9.1) 4(-5.6,8.45) 5(-5.6,7.8) 6(-5.6,7.15) 7(-5.6,6.5) 8(-5.6,5.85) 9(-5.6,5.2) 10(-5.6,4.55) 11(-5.6,3.9) 12(-5.6,3.25) 13(-5.6,2.6) 14(-5.6,1.95) 15(-5.6,1.3) 16(-5.6,0.65) 17(-5.6,0) 18(-5.6,-0.65) 19(-5.6,-1.3) 20(-5.6,-1.95) 21(-5.6,-2.6) 22(-5.6,-3.25) 23(-5.6,-3.9) 24(-5.6,-4.55) 25(-5.6,-5.2) 26(-5.6,-5.85) 27(-5.6,-6.5) 28(-5.6,-7.15) 29(-5.6,-7.8) 30(-5.6,-8.45) 31(-5.6,-9.1) 32(-5.6,-9.75) 33(-5.6,-10.4) 34(5.6,-10.4) 35(5.6,-9.75) 36(5.6,-9.1) 37(5.6,-8.45) 38(5.6,-7.8) 39(5.6,-7.15) 40(5.6,-6.5) 41(5.6,-5.85) 42(5.6,-5.2) 43(5.6,-4.55) 44(5.6,-3.9) 45(5.6,-3.25) 46(5.6,-2.6) 47(5.6,-1.95) 48(5.6,-1.3) 49(5.6,-0.65) 50(5.6,0) 51(5.6,0.65) 52(5.6,1.3) 53(5.6,1.95) 54(5.6,2.6) 55(5.6,3.25) 56(5.6,3.9) 57(5.6,4.55) 58(5.6,5.2) 59(5.6,5.85) 60(5.6,6.5) 61(5.6,7.15) 62(5.6,7.8) 63(5.6,8.45) 64(5.6,9.1) 65(5.6,9.75) 66(5.6,10.4)
USB-A_TH [mm] "USB-A_TH"
  round 1.508 hole 1: 1(-3.5,12.99) 2(-1,12.99) 3(1,12.99) 4(3.5,12.99)
  round 2.8 hole 2.3: S$1(-6.57,10.28) S$2(6.57,10.28)
USB-MICROB [mm] "USB-MICROB"
  rect 0.35x1.2 smd: D+(0,2.65) D-(-0.65,2.65) GND(1.3,2.65) ID(0.65,2.65) VBUS(-1.3,2.65)
  rect 1.5x2.2 smd far side: P$1(-3.6,-0.1) P$2(3.6,-0.1)
  rect 1.5x2.2 smd: S$1(-3.5,0) S$6(3.5,0)
  rect 1.6x1.2 smd: S$2(-2.7,2.2) S$5(2.7,2.2)
  rect 1.3x1.8 smd: S$3(-0.7,-0.1) S$4(0.7,-0.1)
WIFI_ANTENNA [mm] "WIFI_ANTENNA"
  rect 1.1x0.5 smd paste+0 mask+0: GND(2.45,0)
  rect 1x0.5 smd paste+0 mask+0: RF(-0.2,0)

## Part data
C1 C2 C5 C6 C7 C8 C9 C10 C11 C12 C13 C14 C15 C17 C18 C19 C20 C21 C22 C23 C24 C25 C26 C27 C28 C29 C30 C31 C32 C33 C34 C35 C36 C46 C47 C48 C49 C50 C51 C52 C53 C55 C57 C60 C61 C62 C63 C64 C65 C66 C67 C70 C71 C72 C73 C74 C75 C76 C77 C78 C79 C80 C81 C82 C83 C86 C87 C88 C89 C90 C91 C92 C93 C94 C95 C96 C97 C98 C99 C100 C101 C102 C105 C106 C108 C111 C115: library part C0402
C3 C107 C110 C112 C119: library part C0603
C4 C16 C38 C84 C85 C103 C104 C109 C113: library part C0805
C37 C45 C114: library part C1206
D1 D2 Q1 Q2: library part SOT23-3
E$1 E$2 E$3 E$4 E$5 E$6: library part FIDUCIAL
E$7: library part CC-BY-SA
GND: library part SHIELD_PAD
GND_CONTACTS: library part GND_3CONTACT
J1: library part J0603
J3: library part RJ45_LP_RA_SMT
L1 L2 L3 L4 L5 L6 L7 L8 L9 L11: library part L0402
L13: library part L1008
L14: library part FERRITE_SELF
LED2: library part LED3MM
LED3: library part LED0603
R2 R3 R4 R7 R11 R12 R13 R14 R15 R16 R17 R18 R20 R21 R22 R23 R24 R25 R26 R27 R28 R29 R30 R31 R32 R33 R34 R35 R36 R37 R38 R39 R40 R41 R42 R43 R44 R45 R46 R47 R48 R49 R50 R51 R52 R53 R54 R55 R56 R57 R58 R59 R60 R61 R62 R63 R64 R65 R68 R71 R76 R77 R78 R79 R82 R83 R84 R91 R92 R93 R96 R97 R98 R99 R100 R101 R102 R103 R104 R106 R107 R108 R109 R110 R111 R112: library part R0402
R94 R95: library part R0603
R113: library part R0805
SW2: library part TACT_SWITCH_SPST_RA_SMT
T1: library part H1601CG
U1: library part DRMLF164
U2: library part TSOP66
U3: library part SOP8
U5 U6: library part SOT23-5
Y1: library part CRYSTAL_32_25

## Free pads (board coordinates)
  round 2.2 hole 2.2 unplated: MH1(9.798,7.956) MH2(44.507,31.016)
  round 1.7 hole 1.7 unplated: MH1(27.412,40.491) MH2(39.412,40.491)
  round 1.6 hole 1.6 unplated: MH3(19.6,17)

## Via types
v1: diameter 0.45, hole 0.3, Top to Bottom, 286 vias
v2: diameter 0.45, hole 0.2, Top to Bottom, 152 vias
v3: diameter 0.6, hole 0.4, Top to Bottom, 31 vias
v4: diameter 0.5, hole 0.2, Top to Bottom, 21 vias
v5: diameter 0.5, hole 0.3, Top to Bottom, 11 vias

## Nets (pads, with @x,y where several pads share a name; then routed paths per layer and width w, separated by ;. In a path a pad name is that pad's centre, name@x,y a point inside that pad or via, vN(x,y) a via of type N, cw(c..) or ccw(c..) an arc to the next point about the centre after c; other vN are vias at no path point)
!CAS: U1.B6 U2.22 | length 25.7
  Top w0.127: v2(24.161,15.182) 24.343,15 U1.B6@24.719,15 ; U2.22@35.355,10.625 36.104,10.625 37.111,11.632 37.111,15.982 38.061,16.932 v2(38.161,17.032)
  Bottom w0.127: v2(24.161,15.182) 24.611,15.182 ; 24.561,15.182 24.611,15.182 ; v2(38.161,17.032) 37.961,17.232 36.961,17.232 36.561,16.832 24.511,16.832 ccw(c24.511,16.682) 24.361,16.682 24.361,16.582 ccw(c24.461,16.582) 24.461,16.482 24.611,16.482 cw(c24.611,16.332) 24.761,16.332 24.761,16.032 cw(c24.661,16.032) 24.661,15.932 24.511,15.932 ccw(c24.511,15.782) 24.361,15.782 24.361,15.682 ccw(c24.461,15.682) 24.461,15.582 24.611,15.582 cw(c24.611,15.432) 24.761,15.432 24.761,15.332 cw(c24.611,15.332) 24.611,15.182
!CLK: R54.1 U1.A86 | length 3.8
  Top w0.127: U1.A86@23.85,11.131 23.85,10.993 24.661,10.182 24.911,10.182 26.679,10.182 R54.1@27.02,10.523
!CLK_B: C6.2 R54.2 R55.2 U2.46 | length 21.2
  Top w0.127: R54.2@27.82,10.523 28.111,10.232 28.661,10.232 30.761,10.232 v2(30.811,10.182) ; v4(45.261,11.182) 45.354,11.275 U2.46@46.555,11.275
  Bottom w0.127: v2(30.811,10.182) 30.911,10.082 31.461,10.082 44.061,10.082 45.161,11.182 v4(45.261,11.182) 45.311,11.232 C6.2@45.961,11.232 ; C6.2@45.931,11.2 C6.2@45.931,11.2 C6.2@45.961,11.232 ; R55.2@46.861,11.182 R55.2@46.861,11.2 ; R55.2@46.947,11.2 R55.2@46.861,11.2 ; C6.2@45.961,11.232 46.829,11.232 R55.2@46.861,11.2
!CS: U1.B5 U2.24 | length 25.7
  Top w0.127: v2(24.161,14.482) 24.701,14.482 U1.B5@24.719,14.5 ; U2.24@35.355,9.325 35.804,9.325 37.811,11.332 37.811,15.482 38.111,15.782 38.561,15.782 v2(39.211,16.432)
  Bottom w0.127: v2(24.161,14.482) 27.111,14.482 28.411,15.782 38.561,15.782 v2(39.211,16.432)
!RAS: U1.A7 U2.23 | length 24.7
  Top w0.127: U1.A7@25.469,14.75 25.743,14.75 25.961,14.532 26.511,14.532 v2(26.961,14.982) ; U2.23@35.355,9.975 35.954,9.975 37.461,11.482 37.461,15.632 v2(38.161,16.332)
  Bottom w0.127: v2(26.961,14.982) 26.861,14.982 cw(c26.861,15.082) 26.761,15.082 26.761,15.282 cw(c26.861,15.282) 26.861,15.382 27.461,15.382 ccw(c27.461,15.482) 27.561,15.482 27.561,15.582 ccw(c27.411,15.582) 27.411,15.732 26.411,15.732 cw(c26.436,15.907) 26.261,15.932 cw(c26.436,15.957) 26.411,16.132 37.961,16.132 v2(38.161,16.332)
!SPI_CS_0: U1.B49 U3.1 | length 13.9
  Top w0.064: 12.861,16.182 13.179,16.5 U1.B49@14.481,16.5
  Top w0.127: v2(5.911,20.982) 5.911,20.682 8.211,18.382 ; 12.861,16.182 12.111,16.182 9.911,18.382 8.311,18.382 ; 8.211,18.382 8.311,18.382 ; 8.211,18.382 8.311,18.382
  Bottom w0.127: U3.1@4.706,23.388 4.706,22.187 v2(5.911,20.982)
!SPI_W: R62.2 R63.1 U3.3 | length 4.7
  Top w0.127: R62.2@4.772,25.336 4.811,25.336 v2(4.811,24.732) 4.811,24.104 R63.1@4.795,24.104
  Bottom w0.127: v2(4.811,24.732) 4.911,24.632 6.661,24.632 7.246,24.047 U3.3@7.246,23.388
!WE: U1.A8 U2.21 | length 24.7
  Top w0.127: U1.A8@25.469,15.25 25.693,15.25 26.011,14.932 v2(26.311,14.932) ; U2.21@35.355,11.275 36.304,11.275 36.761,11.732 36.761,16.282 36.761,16.382 v2(37.061,16.682)
  Bottom w0.127: v2(26.311,14.932) 26.286,14.907 25.286,14.907 cw(c25.286,15.032) 25.161,15.032 cw(c25.286,15.057) 25.261,15.182 25.711,15.182 25.811,15.182 ccw(c25.786,15.307) 25.911,15.332 ccw(c25.761,15.332) 25.761,15.482 25.311,15.482 cw(c25.311,15.632) 25.161,15.632 cw(c25.311,15.632) 25.311,15.782 25.761,15.782 ccw(c25.736,15.957) 25.911,15.982 ccw(c25.761,15.982) 25.761,16.132 25.311,16.132 cw(c25.311,16.282) 25.161,16.282 cw(c25.361,16.282) 25.361,16.482 36.861,16.482 v2(37.061,16.682)